# Altium PCB Mega2560_Custom.PcbDoc (part 4 of 6)
Units mil, origin at the board's own origin, x right, y up, seen from the top; angles counter-clockwise.
Board outline 4742.41 x 2889.95 mil, 2 copper layers (Top Layer, Bottom Layer), stack 57 mil thick; 215 components, 134 nets, 793 pads, 779 vias.
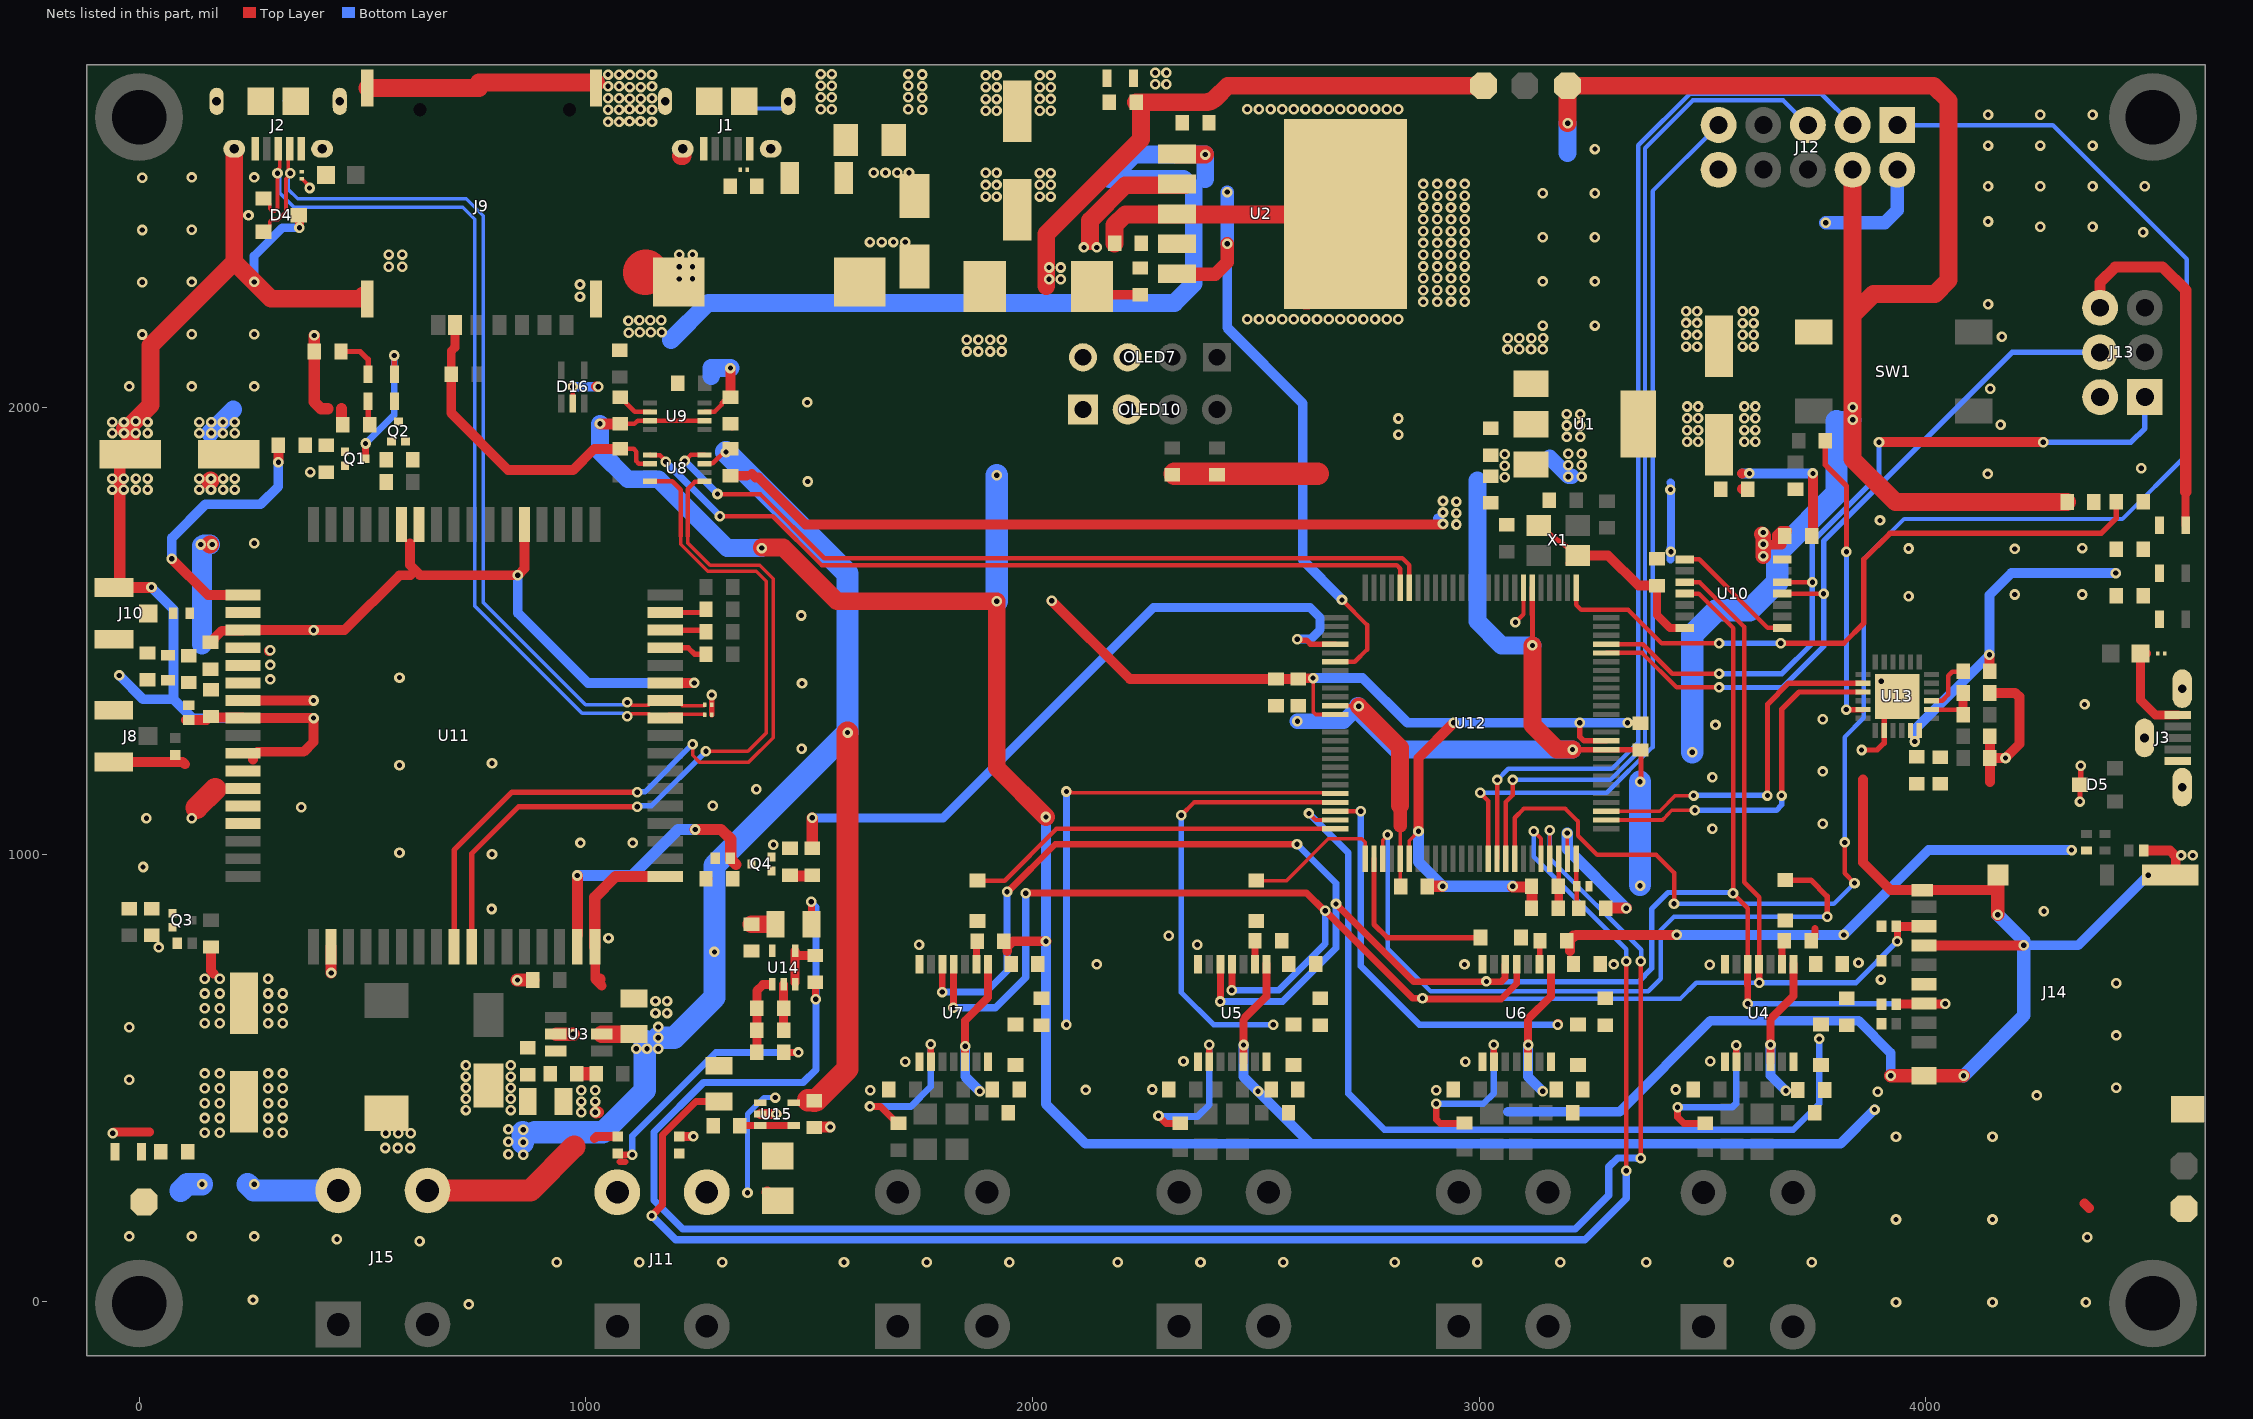
[diagram p2: the nets of this part, all layers, seen from the top]

## Part data (continued)
R35: library part RC0603FR-071ML, "RES SMD 1M OHM 1% 1/10W 0603", Case Code (Imperial)=0603, Case Code (Metric)=1608, LCSC Part Number=C105578, Manufacturer=Yageo, Max Operating Temperature=155°C, Min Operating Temperature=-55°C, Package Quantity=5000, Power Rating=100mW, Resistance=1MR, Supplier Part Number 1=311-1.00MHRDKR-ND, Temperature Coefficient=100ppm/°C, Tolerance=1%, Voltage Rating=50V, Case/Package=0603, ComponentLink1Description=http://www.farnell.com/datasheets/2167052.pdf?src-supplier=Mouser, ComponentLink1URL=http://www.farnell.com/datasheets/2167052.pdf?src-supplier=Mouser, ComponentLink2Description=http://www.farnell.com/datasheets/2167052.pdf?src-supplier=Element14, ComponentLink2URL=http://www.farnell.com/datasheets/2167052.pdf?src-supplier=Element14, ComponentLink3Description=http://documents.rs-components.com/techlib://itc_doclist_GB.htm?stockno=5048956&src-supplier=RSComponents, ComponentLink3URL=http://documents.rs-components.com/techlib://itc_doclist_GB.htm?stockno=5048956&src-supplier=RSComponents, Composition="Thick Film", Depth=0.8mm, Height=0.45mm, Lead Free="Lead Free", Length=1.6mm, Manufacturer Part Number=RC0603FR-071ML, Military Standard=Not, Number of Pins=2, Packaging="Tape and Reel", Pricing 1="1=0.1, 10=0.023, 100=0.0094, 1000=0.00421, 2500=0.00366 (USD)", REACH SVHC="No SVHC", Stock 1=3824601, Supplier 1=Digi-Key, Termination=SMD/SMT, Voltage Rating (DC)=50V, Width=0.8mm
R41 R45 R46: library part RC0603FR-07470RL, "RES 470 OHM 1% 1/10W 0603", Case Code (Imperial)=0603, Case Code (Metric)=1608, LCSC Part Number=C114669, Manufacturer=Yageo, Max Operating Temperature=155°C, Max Power Dissipation=100mW, Min Operating Temperature=-55°C, Package Quantity=1, Resistance Tolerance=1%, Resistor Type="Thick Film", Supplier Part Number 1=311-470HRCT-ND, Temperature Coefficient=100ppm/°C, Voltage Rating=50V, Working Voltage=75V, Case/Package=0603, Category="Chip SMD Resistors", ComponentLink1Description=https://datasheet.ciiva.com/11808/0900766b80f96399-11808177.pdf?src-supplier=RSComponents, ComponentLink1URL=https://datasheet.ciiva.com/11808/0900766b80f96399-11808177.pdf?src-supplier=RSComponents, ComponentLink2Description=https://datasheet.ciiva.com/7746/1738695-7746359.pdf?src-supplier=Element14, ComponentLink2URL=https://datasheet.ciiva.com/7746/1738695-7746359.pdf?src-supplier=Element14, ComponentLink3Description=https://datasheet.ciiva.com/7746/1738695-7746360.pdf?src-supplier=Element14, ComponentLink3URL=https://datasheet.ciiva.com/7746/1738695-7746360.pdf?src-supplier=Element14, ComponentLink4Description=https://datasheet.ciiva.com/7660/1868787-7660793.pdf?src-supplier=Element14, ComponentLink4URL=https://datasheet.ciiva.com/7660/1868787-7660793.pdf?src-supplier=Element14, ComponentLink5Description=https://datasheet.ciiva.com/46440/1868787-46440907.pdf?src-supplier=Element14, ComponentLink5URL=https://datasheet.ciiva.com/46440/1868787-46440907.pdf?src-supplier=Element14, ComponentLink6Description=https://datasheet.ciiva.com/2454/pyu-r-int-thick-7-2454012.pdf?src-supplier=Digi-Key, ComponentLink6URL=https://datasheet.ciiva.com/2454/pyu-r-int-thick-7-2454012.pdf?src-supplier=Digi-Key, ComponentLink7Description=https://datasheet.ciiva.com/2454/pyu-r-int-thick-7-2454013.pdf?src-supplier=Digi-Key, ComponentLink7URL=https://datasheet.ciiva.com/2454/pyu-r-int-thick-7-2454013.pdf?src-supplier=Digi-Key, ComponentLink8Description=https://datasheet.ciiva.com/2454/pyu-r-int-thick-7-2454014.pdf?src-supplier=Digi-Key, ComponentLink8URL=https://datasheet.ciiva.com/2454/pyu-r-int-thick-7-2454014.pdf?src-supplier=Digi-Key, Construction=Rectangular, Depth=0.8mm, Features="Moisture Resistant", Height=0.022inch, Lead Free="Lead Free", Length=1.6mm, Manufacturer Part Number=RC0603FR-07470RL, Military Standard=Not, Number of Terminations=2, Packaging="Tape and Reel", Power Rating=100mW, Pricing 1="1=0.10000, 10=0.02400, 100=0.00970, 1000=0.00436, 2500=0.00378 (USD)", REACH SVHC="No SVHC", Resistance=470R, RoHS=Yes, RoHS Compliant=Yes, Series=RC, Stock 1=154083, Supplier 1=Digi-Key, Technology="THICK FILM", Termination=SMD/SMT, Tolerance=1%, Width=0.031inch
R42: library part RC0603FR-0722K1L, "RES 22.1K OHM 1% 1/10W 0603", Case Code (Imperial)=0603, Case Code (Metric)=1608, LCSC Part Number=C137768, Manufacturer=Yageo, Max Operating Temperature=155°C, Min Operating Temperature=-55°C, Package Quantity=5000, Power Rating=100mW, Resistance=22.1kR, Temperature Coefficient=100ppm/°C, Tolerance=1%, Voltage Rating=50V, Case/Package=0603, Category="Chip SMD Resistors", ComponentLink1Description=https://datasheet.ciiva.com/12555/rc0603-272842-12555287.pdf?src-supplier=Mouser, ComponentLink1URL=https://datasheet.ciiva.com/12555/rc0603-272842-12555287.pdf?src-supplier=Mouser, Height=0.45mm, Item Type=Resistor, Lead Free="Lead Free", Length=1.6mm, Manufacturer Part Number=RC0603FR-0722K1L, Packaging="Tape and Reel", Pricing 1="5000=0.00133, 10000=0.00131, 20000=0.00127 (USD)", RoHS=Yes, RoHS Compliant=Yes, Series=RC, Size Code=0603, Stock 1=595000, Supplier 1=Avnet, Supplier Part Number 1=RC0603FR-0722K1L, Termination=SMD/SMT, Voltage Rating (DC)=50V, Width=0.8mm
R43: library part RC0603FR-0747K5L, "RES 47.5K OHM 1% 1/10W 0603", Case Code (Imperial)=0603, Case Code (Metric)=1608, LCSC Part Number=C137715, Manufacturer=Yageo, Max Operating Temperature=155°C, Max Power Dissipation=100mW, Min Operating Temperature=-55°C, Package Quantity=5000, Resistance=47.5kR, Resistance Tolerance=1%, Resistor Type="Thick Film", Temperature Coefficient=100ppm/°C, Voltage Rating=50V, Case/Package=0603, Category="Chip SMD Resistors", ComponentLink1Description=https://datasheet.ciiva.com/11808/0900766b80f96399-11808343.pdf?src-supplier=RSComponents, ComponentLink1URL=https://datasheet.ciiva.com/11808/0900766b80f96399-11808343.pdf?src-supplier=RSComponents, ComponentLink2Description=https://datasheet.ciiva.com/2454/pyu-r-int-thick-7-2454790.pdf?src-supplier=Digi-Key, ComponentLink2URL=https://datasheet.ciiva.com/2454/pyu-r-int-thick-7-2454790.pdf?src-supplier=Digi-Key, ComponentLink3Description=https://datasheet.ciiva.com/2454/pyu-r-int-thick-7-2454791.pdf?src-supplier=Digi-Key, ComponentLink3URL=https://datasheet.ciiva.com/2454/pyu-r-int-thick-7-2454791.pdf?src-supplier=Digi-Key, ComponentLink4Description=https://datasheet.ciiva.com/2454/pyu-r-int-thick-7-2454789.pdf?src-supplier=Digi-Key, ComponentLink4URL=https://datasheet.ciiva.com/2454/pyu-r-int-thick-7-2454789.pdf?src-supplier=Digi-Key, ComponentLink5Description=https://datasheet.ciiva.com/12555/rc0603-272842-12555285.pdf?src-supplier=Mouser, ComponentLink5URL=https://datasheet.ciiva.com/12555/rc0603-272842-12555285.pdf?src-supplier=Mouser, ComponentLink6Description=https://datasheet.ciiva.com/15189/getdatasheetpartid-135115-15189741.pdf?src-supplier=Verical, ComponentLink6URL=https://datasheet.ciiva.com/15189/getdatasheetpartid-135115-15189741.pdf?src-supplier=Verical, Construction=Rectangular, Depth=0.8mm, Features="Moisture Resistant", Height=0.45mm, Item Type=Resistor, Lead Free="Lead Free", Length=1.6mm, Manufacturer Part Number=RC0603FR-0747K5L, Military Standard=Not, Number of Pins=2, Number of Terminations=2, Packaging="Tape and Reel", Power Rating=100mW, Pricing 1="5000=0.00133, 10000=0.00131, 20000=0.00127 (USD)", Reach SVHC Compliant=Yes, RoHS=Yes, RoHS Compliant=Yes, Series=RC, Size Code=0603, Stock 1=20000, Supplier 1=Avnet, Supplier Part Number 1=RC0603FR-0747K5L, Technology="THICK FILM", Termination=SMD/SMT, Tolerance=1%, Voltage Rating (DC)=50V, Width=0.031inch
R47: library part RC0402FR-0722RL, "RES 22 OHM 1% 1/16W 0402", Case Code (Imperial)=0402, Case Code (Metric)=1005, Manufacturer=Yageo, Max Operating Temperature=155°C, Max Power Dissipation=63mW, Min Operating Temperature=-55°C, Power Rating=62.5mW, Resistance=22R, Resistance Tolerance=1%, Resistor Type="Thick Film", Supplier Part Number 1=311-22.0LRCT-ND, Temperature Coefficient=100ppm/°C, Voltage Rating=50V, Case/Package=0402, Category="Chip SMD Resistors", ComponentLink1Description=https://datasheet.ciiva.com/11819/0900766b80c66297-11819462.pdf?src-supplier=RSComponents, ComponentLink1URL=https://datasheet.ciiva.com/11819/0900766b80c66297-11819462.pdf?src-supplier=RSComponents, ComponentLink2Description=https://datasheet.ciiva.com/7849/1018594-7849912.pdf?src-supplier=Element14, ComponentLink2URL=https://datasheet.ciiva.com/7849/1018594-7849912.pdf?src-supplier=Element14, ComponentLink3Description=https://datasheet.ciiva.com/7849/1018594-7849911.pdf?src-supplier=Element14, ComponentLink3URL=https://datasheet.ciiva.com/7849/1018594-7849911.pdf?src-supplier=Element14, ComponentLink4Description=https://datasheet.ciiva.com/16930/pyu-rc0402-51-rohs-l-6-r-16930687.pdf?src-supplier=Future+Electronics, ComponentLink4URL=https://datasheet.ciiva.com/16930/pyu-rc0402-51-rohs-l-6-r-16930687.pdf?src-supplier=Future+Electronics, ComponentLink5Description=https://datasheet.ciiva.com/26829/getdatasheetpartid-554995-26829991.pdf?src-supplier=Verical, ComponentLink5URL=https://datasheet.ciiva.com/26829/getdatasheetpartid-554995-26829991.pdf?src-supplier=Verical, Construction=Rectangular, Depth=0.5mm, Features="Moisture Resistant", Height=0.32mm, Lead Free="Lead Free", Length=1mm, Manufacturer Part Number=RC0402FR-0722RL, Military Standard=Not, Number of Pins=2, Number of Terminations=2, Packaging="Tape and Reel", Pricing 1="1=0.10000, 10=0.01400, 100=0.00580, 1000=0.00262, 2500=0.00228, 5000=0.00188 (USD)", Reach SVHC Compliant=Yes, RoHS=Yes, RoHS Compliant=Yes, Series=RC, Size Code=0402, Stock 1=7045379, Supplier 1=Digi-Key, Technology="THICK FILM", Termination=SMD/SMT, Tolerance=1%, Voltage Rating (DC)=50V, Width=0.5mm
R48: library part RC0402FR-07100KL, "RES 100K OHM 1% 1/16W 0402", Case Code (Imperial)=0402, Case Code (Metric)=1005, Manufacturer=Yageo, Max Operating Temperature=155°C, Max Power Dissipation=63mW, Min Operating Temperature=-55°C, Package Quantity=1, Resistance=100kR, Resistance Tolerance=1%, Resistor Type="Thick Film", Supplier Part Number 1=603-RC0402FR-07100KL, Temperature Coefficient=100ppm/°C, Voltage Rating=50V, Case/Package=0402, Category="Chip SMD Resistors", ComponentLink1Description=https://datasheet.ciiva.com/11819/0900766b80c66297-11819452.pdf?src-supplier=RSComponents, ComponentLink1URL=https://datasheet.ciiva.com/11819/0900766b80c66297-11819452.pdf?src-supplier=RSComponents, ComponentLink2Description=https://datasheet.ciiva.com/22747/1018594-22747509.pdf?src-supplier=Element14, ComponentLink2URL=https://datasheet.ciiva.com/22747/1018594-22747509.pdf?src-supplier=Element14, ComponentLink3Description=https://datasheet.ciiva.com/2453/pyu-r-int-thick-7-2453362.pdf?src-supplier=Digi-Key, ComponentLink3URL=https://datasheet.ciiva.com/2453/pyu-r-int-thick-7-2453362.pdf?src-supplier=Digi-Key, ComponentLink4Description=https://datasheet.ciiva.com/2453/pyu-r-int-thick-7-2453363.pdf?src-supplier=Digi-Key, ComponentLink4URL=https://datasheet.ciiva.com/2453/pyu-r-int-thick-7-2453363.pdf?src-supplier=Digi-Key, ComponentLink5Description=https://datasheet.ciiva.com/2453/pyu-r-int-thick-7-2453361.pdf?src-supplier=Digi-Key, ComponentLink5URL=https://datasheet.ciiva.com/2453/pyu-r-int-thick-7-2453361.pdf?src-supplier=Digi-Key, ComponentLink6Description=https://datasheet.ciiva.com/12667/pyu-rc0402-51-rohs-l-6-r-12667930.pdf?src-supplier=Mouser, ComponentLink6URL=https://datasheet.ciiva.com/12667/pyu-rc0402-51-rohs-l-6-r-12667930.pdf?src-supplier=Mouser, ComponentLink7Description=https://datasheet.ciiva.com/15189/getdatasheetpartid-323696-15189334.pdf?src-supplier=Verical, ComponentLink7URL=https://datasheet.ciiva.com/15189/getdatasheetpartid-323696-15189334.pdf?src-supplier=Verical, Construction=Rectangular, Depth=0.5mm, Features="Moisture Resistant", Height=0.016inch, Lead Free="Lead Free", Length=0.039inch, Manufacturer Part Number=RC0402FR-07100KL, Military Standard=Not, Number of Terminations=2, Packaging="Tape and Reel", Power Rating=63mW, Pricing 1="1=0.10000, 10=0.01200, 50=0.01200, 100=0.00500, 1000=0.00300, 2500=0.00200, 10000=0.00100 (USD)", REACH SVHC="No SVHC", RoHS=Yes, RoHS Compliant=Yes, Series=RC, Stock 1=7759549, Supplier 1=Mouser, Technology="THICK FILM", Termination=SMD/SMT, Tolerance=1%, Width=0.02inch, Working Voltage=50V
R50: library part ARG06BTC2500, "±0.1% 250Ω 1206 Chip Resistor - Surface Mount ROHS", LCSC Part Number=C3033906, Manufacturer="Viking Tech", Package=1206, ComponentLink1Description=LCSC, ComponentLink1URL=https://www.lcsc.com/product-detail/Chip-Resistor-Surface-Mount_Viking-Tech-ARG06BTC2500_C3033906.html, Item Type=Resistor, Manufacturer Part Number=ARG06BTC2500
R51: library part RT0603BRD073K3L, "RES SMD 3.3K OHM 0.1% 1/10W 0603", Case Code (Imperial)=0603, Case Code (Metric)=1608, LCSC Part Number=C309653, Manufacturer=Yageo, Max Operating Temperature=125°C, Max Power Dissipation=100mW, Min Operating Temperature=-55°C, Package Quantity=5000, Resistance=3.3kR, Resistor Type="Thin Film", Temperature Coefficient=25ppm/°C, Tolerance=0.1%, Voltage Rating=75V, Voltage Rating (DC)=50V, Case/Package=0603, Category="Chip SMD Resistors", ComponentLink1Description=https://datasheet.ciiva.com/11814/0900766b8027bd26-11814026.pdf?src-supplier=Rs, ComponentLink1URL=https://datasheet.ciiva.com/11814/0900766b8027bd26-11814026.pdf?src-supplier=Rs, ComponentLink2Description=https://datasheet.ciiva.com/12694/pyu-rt-1-to-0-05-rohs-l-4-12694839.pdf?src-supplier=Mouser, ComponentLink2URL=https://datasheet.ciiva.com/12694/pyu-rt-1-to-0-05-rohs-l-4-12694839.pdf?src-supplier=Mouser, ComponentLink3Description=https://datasheet.ciiva.com/2585/pyu-rt-1-to-0-05-rohs-l-4-2585926.pdf?src-supplier=Digi-Key, ComponentLink3URL=https://datasheet.ciiva.com/2585/pyu-rt-1-to-0-05-rohs-l-4-2585926.pdf?src-supplier=Digi-Key, Construction=Rectangular, Contact Plating=Tin,Lead, Depth=0.8mm, Features="Moisture Resistant", Height=0.022inch, Item Type=Resistor, Lead Free="Lead Free", Length=0.063inch, Manufacturer Part Number=RT0603BRD073K3L, Military Standard=Not, Number of Terminations=2, Packaging="Tape and Reel", Power Rating=100mW, Pricing 1="1=0.30610, 10=0.21080, 25=0.17430, 100=0.09180, 250=0.09000, 500=0.07600, 1000=0.04220 (USD)", RoHS=Yes, RoHS Compliant=Yes, Series=RT, Stock 1=2417, Supplier 1="Arrow Electronics", Supplier Part Number 1=RT0603BRD073K3L, Termination=SMD/SMT, Width=0.031inch
R52 R55: library part RC0603FR-07680RL, "RES SMD 680 OHM 1% 1/10W 0603", LCSC Part Number=C112310, Manufacturer=Yageo, Package=0603, ComponentLink4Description=LCSC, ComponentLink4URL=https://www.lcsc.com/product-detail/Chip-Resistor-Surface-Mount_YAGEO-RC0603FR-07680RL_C112310.html, Item Type=Resistor, Manufacturer Part Number=RC0603FR-07680RL
R53: library part RC0603JR-070RL, "RES 0 OHM JUMPER 1/10W 0603", Case Code (Imperial)=0603, Case Code (Metric)=1608, LCSC Part Number=C95177, Manufacturer=Yageo, Max Operating Temperature=155°C, Max Power Dissipation=100mW, Min Operating Temperature=-55°C, Package Quantity=5000, Resistance=0mR, Resistance Tolerance=5%, Resistor Type="Thick Film", Supplier Part Number 1=311-0.0GRCT-ND, Temperature Coefficient=200ppm/°C, Tolerance=1%, Voltage Rating=50V, Case/Package=0603, Category="Chip SMD Resistors", Construction=Rectangular, Contact Plating=Tin,Matte, Depth=0.8mm, Features="Moisture Resistant", Height=0.45mm, Item Type=Resistor, Lead Free="Lead Free", Length=1.6mm, Manufacturer Part Number=RC0603JR-070RL, Military Standard=Not, Number of Pins=2, Number of Terminations=2, Packaging="Tape and Reel", Power Rating=100mW, Pricing 1="1=0.10000, 10=0.01700, 25=0.01240, 50=0.00960, 100=0.00700, 250=0.00536, 500=0.00430, 1000=0.00316 (USD)", Radiation Hardening=No, Reach SVHC Compliant="No SVHC", RoHS=Yes, RoHS Compliant=Yes, Series=RC, Size Code=0603, Stock 1=18081776, Supplier 1=Digi-Key, Technology="THICK FILM", Termination=SMD/SMT, Voltage Rating (DC)=50V, Width=0.8mm
R54: library part RT0603BRB072K2L, "RES SMD 2.2K OHM 0.1% 1/10W 0603", Case Code (Imperial)=0603, Case Code (Metric)=1608, LCSC Part Number=C860297, Manufacturer=Yageo, Max Operating Temperature=155°C, Max Power Dissipation=100mW, Min Operating Temperature=-55°C, Supplier Part Number=YAG2182CT-ND, Temperature Coefficient=10ppm/°C, Tolerance=0.1%, Case/Package=0603, Category="Chip SMD Resistors", ComponentLink1Description=http://www.yageo.com/documents/recent/PYu-RT_1-to-0.01_RoHS_L_7.pdf?src-supplier=Digi-Key, ComponentLink1URL=http://www.yageo.com/documents/recent/PYu-RT_1-to-0.01_RoHS_L_7.pdf?src-supplier=Digi-Key, ComponentLink2Description=http://www.yageo.com/documents/recent/PYu-RT_1-to-0.01_RoHS_L_9.pdf?src-supplier=Digi-Key, ComponentLink2URL=http://www.yageo.com/documents/recent/PYu-RT_1-to-0.01_RoHS_L_9.pdf?src-supplier=Digi-Key, Item Type=Resistor, Manufacturer Part Number=RT0603BRB072K2L, Number of Terminations=2, Packaging="Cut Tape", Pricing="1=0.6, 10=0.446, 50=0.3148, 100=0.2597, 500=0.1836, 1000=0.14563 (USD)", RoHS=Yes, RoHS Compliant=Yes, Series=RT, Stock=518, Supplier=Digi-Key
SB1: "Solder Bridge ON"
SW1: library part TL3301NF160QG, "SWITCH TACTILE SPST-NO 0.05A 12V", LCSC Part Number=C273526, Manufacturer=E-Switch, Manufacturer Part Number=TL3301NF160QG/TR, Package="SMD (6.00mm x 6.00mm)", ComponentLink1Description=LCSC, ComponentLink1URL=https://www.lcsc.com/product-detail/Tactile-Switches_E-Switch-TL3301NF160QG_C273526.html
U1: "15V 1.3V @ 800mA Fixed 3.3V SOT-223 Linear Voltage Regulators (LDO) ROHS", LCSC Part Number=C92102, Manufacturer="Diodes Incorporated", Package=SOT-223, ComponentLink1Description=LCSC, ComponentLink1URL=https://lcsc.com/product-detail/Linear-Voltage-Regulators-LDO_Diodes-Incorporated-AZ1117CH-3-3TRG1_C92102.html, Item Type=IC, Manufacturer Part Number=AZ1117CH-3.3TRG1
U2: "IC REG BUCK ADJ 3A TO263-5", Case/Package=TO-263, LCSC Part Number=C1355333, Manufacturer="TI National Semiconductor", Max Input Voltage=40V, Max Operating Temperature=125°C, Max Output current=3A, Max Output Voltage=37V, Min Input Voltage=4.5V, Min Operating Temperature=-40°C, Min Output Voltage=1.2V, Quiescent Current=5mA, Supplier Part Number 1=926-LM2596S-ADJ/NOPB, Switching Frequency=173kHz, Category="Voltage Regulators - Switching", ComponentLink1Description=https://datasheet.ciiva.com/27056/2051160-27056491.pdf?src-supplier=Jameco, ComponentLink1URL=https://datasheet.ciiva.com/27056/2051160-27056491.pdf?src-supplier=Jameco, ComponentLink2Description=https://datasheet.ciiva.com/15112/getdatasheetpartid-55559-15112636.pdf?src-supplier=Verical, ComponentLink2URL=https://datasheet.ciiva.com/15112/getdatasheetpartid-55559-15112636.pdf?src-supplier=Verical, ComponentLink3Description=https://datasheet.ciiva.com/41457/001013814-da-01-en-ic-reg-buc-lm2596s-adj-nopb-to-263-5-tid-41457756.pdf?src-supplier=Conrad, ComponentLink3URL=https://datasheet.ciiva.com/41457/001013814-da-01-en-ic-reg-buc-lm2596s-adj-nopb-to-263-5-tid-41457756.pdf?src-supplier=Conrad, ComponentLink4Description=https://datasheet.ciiva.com/22669/1874590-22669464.pdf?src-supplier=Element14, ComponentLink4URL=https://datasheet.ciiva.com/22669/1874590-22669464.pdf?src-supplier=Element14, ComponentLink5Description=https://datasheet.ciiva.com/14150/jqlm2596x-xx-e-14150653.pdf?src-supplier=Distrelec, ComponentLink5URL=https://datasheet.ciiva.com/14150/jqlm2596x-xx-e-14150653.pdf?src-supplier=Distrelec, ComponentLink6Description=https://datasheet.ciiva.com/6596/lm2596-6596342.pdf?src-supplier=Digi-Key, ComponentLink6URL=https://datasheet.ciiva.com/6596/lm2596-6596342.pdf?src-supplier=Digi-Key, Contact Plating=Tin,Matte, Efficiency=73%, Height=4.57mm, Item Type=IC, Lead Free="Contains Lead", Length=10.16mm, Manufacturer Part Number=LM2596S-ADJ/NOPB, Mount="Surface Mount", Number of Outputs=1, Number of Pins=5, Operating Supply Voltage=40V, Output Current=3A, Output Type=Adjustable, Output Voltage=37V, Packaging=Rail/Tube, Pricing 1="1=7.15000, 10=6.46000, 50=6.16000, 100=5.34000, 1000=5.10000, 10000=5.10000 (USD)", Radiation Hardening=No, Reach SVHC Compliant=Yes, RoHS=Yes, RoHS Compliant=Yes, Series=LM2596, Supplier 1=Mouser, Weight=0.056128oz, Width=8.64mm
U3: "boost converterType 1 Boost 28V 2V~24V 1.2MHz SOT-23-6 DC-DC Converters ROHS", LCSC Part Number=C84817, Manufacturer="XI'AN Aerosemi Tech", Package=SOT-23-6, ComponentLink1Description=LCSC, ComponentLink1URL=https://www.lcsc.com/product-detail/DC-DC-Converters_XI-AN-Aerosemi-Tech-MT3608_C84817.html, Item Type=IC, Manufacturer Part Number=MT3608
U4 U5 U6 U7: "IC CONV THERMOCOUPLE 14TSSOP", Case/Package=TSSOP, LCSC Part Number=C2653162, Manufacturer=Maxim, Max Operating Temperature=125°C, Min Operating Temperature=-55°C, Operating Supply Current=1.2mA, Category="Interface ICs", ComponentLink1Description=https://media.digikey.com/pdf/Data%20Sheets/Maxim%20PDFs/PartNumberBreakdown_ds.pdf?src-supplier=Digi-Key, ComponentLink1URL=https://media.digikey.com/pdf/Data%20Sheets/Maxim%20PDFs/PartNumberBreakdown_ds.pdf?src-supplier=Digi-Key, ComponentLink2Description=http://datasheets.maximintegrated.com/en/ds/MAX31856.pdf?src-supplier=Avnet, ComponentLink2URL=http://datasheets.maximintegrated.com/en/ds/MAX31856.pdf?src-supplier=Avnet, Interface=SPI, Item Type=IC, Manufacturer Part Number=MAX31856MUD+T, Mount="Surface Mount", Number of Pins=14, Output Type=Digital, Packaging="Tape and Reel", Pricing 1="1=10.21890, 10=9.52090, 25=9.06320, 100=7.80510, 250=7.38990, 500=6.66890, 1000=6.39750, 3000=6.32960 (USD)", RoHS=Yes, RoHS Compliant=Yes, Stock 1=2890, Supplier 1="Arrow Electronics", Supplier Part Number 1=MAX31856MUD+T
U8: "IC TRNSLTR BIDIRECTIONAL US8", Case/Package=VSSOP, High Level Output Current=-20uA, LCSC Part Number=C2677366, Low Level Output Current=20uA, Manufacturer="Texas Instruments", Max Operating Temperature=85°C, Max Supply Voltage=5.5V, Min Operating Temperature=-40°C, Min Supply Voltage=1.65V, Output Current=50mA, Package Quantity=1, Category="Integrated Circuits (ICs)", ComponentLink1Description=https://datasheet.ciiva.com/4226/sces641b-4226901.pdf?src-supplier=Arrow+Electronics, ComponentLink1URL=https://datasheet.ciiva.com/4226/sces641b-4226901.pdf?src-supplier=Arrow+Electronics, ComponentLink2Description=https://datasheet.ciiva.com/15096/getdatasheetpartid-226009-15096242.pdf?src-supplier=Verical, ComponentLink2URL=https://datasheet.ciiva.com/15096/getdatasheetpartid-226009-15096242.pdf?src-supplier=Verical, ComponentLink3Description=https://datasheet.ciiva.com/14287/txb0102-14287498.pdf?src-supplier=Avnet, ComponentLink3URL=https://datasheet.ciiva.com/14287/txb0102-14287498.pdf?src-supplier=Avnet, ComponentLink4Description=https://datasheet.ciiva.com/14287/txb0102-14287370.pdf?src-supplier=Avnet, ComponentLink4URL=https://datasheet.ciiva.com/14287/txb0102-14287370.pdf?src-supplier=Avnet, ComponentLink5Description=https://datasheet.ciiva.com/6619/txb0102-6619255.pdf?src-supplier=Digi-Key, ComponentLink5URL=https://datasheet.ciiva.com/6619/txb0102-6619255.pdf?src-supplier=Digi-Key, ComponentLink6Description=https://datasheet.ciiva.com/6619/txb0102-6619256.pdf?src-supplier=Digi-Key, ComponentLink6URL=https://datasheet.ciiva.com/6619/txb0102-6619256.pdf?src-supplier=Digi-Key, ComponentLink7Description=https://datasheet.ciiva.com/6619/txb0102-6619257.pdf?src-supplier=Digi-Key, ComponentLink7URL=https://datasheet.ciiva.com/6619/txb0102-6619257.pdf?src-supplier=Digi-Key, Contact Plating=Gold, Data Rate=100Mbps, Height=0.85mm, Item Type=IC, Lead Free="Lead Free", Length=2.3mm, Logic Function=Translator, Manufacturer Part Number=TXB0102DCUT, Mount="Surface Mount", Number of Bits=2, Number of Channels=2, Number of Inputs=2, Number of Pins=8, Output Type=3-STATE, Packaging="Tape and Reel", Pricing 1="1=0.79330, 10=0.66470, 25=0.65820, 250=0.37450, 500=0.36200, 1000=0.29770, 2500=0.28440 (USD)", Propagation Delay=31ns, Radiation Hardening=No, REACH SVHC="No SVHC", RoHS=Yes, RoHS Compliant=Yes, Series=-, Stock 1=10, Supplier 1="Arrow Electronics", Supplier Part Number 1=TXB0102DCUT, Turn-On Delay Time=7.4ns, Weight=0.000339oz, Width=2mm
U9: "IC TRANSLTR BIDIRECTIONAL 8VSSOP", Case/Package=VSSOP, LCSC Part Number=C53434, Manufacturer="Texas Instruments", Max Operating Temperature=85°C, Max Supply Voltage=3.6V, Min Operating Temperature=-40°C, Min Supply Voltage=1.65V, Nominal Supply Voltage=1.8V, Package Body Material=Plastic, Package Shape=Rectangular, Package Style="SMALL OUTLINE, VERY THIN PROFILE, SHRINK PITCHMeter", Peak Reflow Temperature (Cel)=260°C, Power Supplies=1.8/3.3,2.5/5V, Supplier Part Number 1=595-TXS0102DCUR, Supply Voltage1-Max=5.5V, Supply Voltage1-Min=2.3V, Supply Voltage1-Nom=2.5V, Temperature Grade=INDUSTRIAL, Category="Voltage Level Shifters", Channels=1, ComponentLink1Description=https://www.ti.com:443/lit/ds/symlink/txs0102.pdf?src-supplier=IHS+Markit, ComponentLink1URL=https://www.ti.com:443/lit/ds/symlink/txs0102.pdf?src-supplier=IHS+Markit, ComponentLink2Description=https://datasheet.ciiva.com/22653/1846850-22653373.pdf?src-supplier=Farnell, ComponentLink2URL=https://datasheet.ciiva.com/22653/1846850-22653373.pdf?src-supplier=Farnell, ComponentLink3Description=https://datasheet.ciiva.com/15096/getdatasheetpartid-118249-15096172.pdf?src-supplier=Verical, ComponentLink3URL=https://datasheet.ciiva.com/15096/getdatasheetpartid-118249-15096172.pdf?src-supplier=Verical, ComponentLink4Description=https://datasheet.ciiva.com/1508/1857232-1508821.pdf?src-supplier=Element14, ComponentLink4URL=https://datasheet.ciiva.com/1508/1857232-1508821.pdf?src-supplier=Element14, ComponentLink5Description=https://datasheet.ciiva.com/28499/1863639-28499676.pdf?src-supplier=Element14, ComponentLink5URL=https://datasheet.ciiva.com/28499/1863639-28499676.pdf?src-supplier=Element14, ComponentLink6Description=https://datasheet.ciiva.com/46395/1863639-46395871.pdf?src-supplier=Element14, ComponentLink6URL=https://datasheet.ciiva.com/46395/1863639-46395871.pdf?src-supplier=Element14, ComponentLink7Description=https://datasheet.ciiva.com/1899/txs0102-1899369.pdf?src-supplier=Digi-Key, ComponentLink7URL=https://datasheet.ciiva.com/1899/txs0102-1899369.pdf?src-supplier=Digi-Key, ComponentLink8Description=https://datasheet.ciiva.com/1899/txs0102-1899368.pdf?src-supplier=Digi-Key, ComponentLink8URL=https://datasheet.ciiva.com/1899/txs0102-1899368.pdf?src-supplier=Digi-Key, ComponentLink9Description=https://datasheet.ciiva.com/1899/txs0102-1899370.pdf?src-supplier=Digi-Key, ComponentLink9URL=https://datasheet.ciiva.com/1899/txs0102-1899370.pdf?src-supplier=Digi-Key, ComponentLink10Description=https://datasheet.ciiva.com/14287/txs0102-14287516.pdf?src-supplier=Avnet, ComponentLink10URL=https://datasheet.ciiva.com/14287/txs0102-14287516.pdf?src-supplier=Avnet, Height - Seated (Max)=0.9mm, Interface IC Type="INTERFACE CIRCUIT", Item Type=IC, JESD-30 Code=R-PDSO-G8, JESD-609 Code=e4, Length=2.3mm, Manufacturer Part Number=TXS0102DCUR, Moisture Sensitivity Level=1, Pins=8, Pricing 1="1=0.93000, 10=0.83300, 50=0.79000, 100=0.64900, 1000=0.42300, 10000=0.40900 (USD)", Qualification Status="Not Qualified", Reach SVHC Compliant=Yes, RoHS=Yes, RoHS Compliant=Yes, Stock 1=246792, Supplier 1=Mouser, Surface Mount=Yes, Terminal Finish=Nickel, Terminal Form="Gull Wing", Terminal Pitch=0.5mm, Terminal Position=DUAL, Width=2mm
U10: "IC TRANSLATOR BIDIR 14TSSOP", Case/Package=TSSOP, High Level Output Current=-20uA, LCSC Part Number=C60708, Low Level Output Current=20uA, Manufacturer="Texas Instruments", Max Operating Temperature=85°C, Max Supply Voltage=5.5V, Min Operating Temperature=-40°C, Min Supply Voltage=1.2V, Nominal Supply Current=5uA, Package Quantity=2000, Quiescent Current=3.5uA, Category="Voltage Level Shifters", Channel Type=Bidirectional, ComponentLink1Description=https://datasheet.ciiva.com/1508/1633692-1508723.pdf?src-supplier=Element14, ComponentLink1URL=https://datasheet.ciiva.com/1508/1633692-1508723.pdf?src-supplier=Element14, ComponentLink2Description=https://datasheet.ciiva.com/22653/1845221-22653354.pdf?src-supplier=Farnell, ComponentLink2URL=https://datasheet.ciiva.com/22653/1845221-22653354.pdf?src-supplier=Farnell, ComponentLink3Description=https://datasheet.ciiva.com/15096/getdatasheetpartid-48026-15096134.pdf?src-supplier=Verical, ComponentLink3URL=https://datasheet.ciiva.com/15096/getdatasheetpartid-48026-15096134.pdf?src-supplier=Verical, ComponentLink4Description=https://datasheet.ciiva.com/1508/1849862-1508724.pdf?src-supplier=Element14, ComponentLink4URL=https://datasheet.ciiva.com/1508/1849862-1508724.pdf?src-supplier=Element14, ComponentLink5Description=https://datasheet.ciiva.com/46395/1864432-46395886.pdf?src-supplier=Element14, ComponentLink5URL=https://datasheet.ciiva.com/46395/1864432-46395886.pdf?src-supplier=Element14, ComponentLink6Description=https://datasheet.ciiva.com/1899/txb0104-1899515.pdf?src-supplier=Digi-Key, ComponentLink6URL=https://datasheet.ciiva.com/1899/txb0104-1899515.pdf?src-supplier=Digi-Key, ComponentLink7Description=https://datasheet.ciiva.com/1899/txb0104-1899514.pdf?src-supplier=Digi-Key, ComponentLink7URL=https://datasheet.ciiva.com/1899/txb0104-1899514.pdf?src-supplier=Digi-Key, ComponentLink8Description=https://datasheet.ciiva.com/1899/txb0104-1899516.pdf?src-supplier=Digi-Key, ComponentLink8URL=https://datasheet.ciiva.com/1899/txb0104-1899516.pdf?src-supplier=Digi-Key, ComponentLink9Description=https://datasheet.ciiva.com/14287/txb0104-14287375.pdf?src-supplier=Avnet, ComponentLink9URL=https://datasheet.ciiva.com/14287/txb0104-14287375.pdf?src-supplier=Avnet, Data Rate=100Mbps, Height=1.15mm, Item Type=IC, Lead Free="Lead Free", Length=5mm, Logic Function=Translator, Manufacturer Part Number=TXB0104PWR, Mount="Surface Mount", Number of Bits=4, Number of Channels=4, Number of Circuits=1, Number of Inputs=4, Number of Pins=14, Output Current=20uA, Output Type=3-STATE, Packaging="Tape and Reel", Pricing 1="1=1.50780, 10=1.39060, 25=1.29340, 100=1.11370, 250=1.03790, 500=0.97230, 1000=0.92410 (USD)", Propagation Delay=31ns, Radiation Hardening=No, Reach SVHC Compliant=Yes, RoHS=Yes, RoHS Compliant=Yes, Series=-, Stock 1=1658, Supplier 1="Arrow Electronics", Supplier Part Number 1=TXB0104PWR, Turn-On Delay Time=7.4ns, Weight=0.002018oz, Width=4.4mm
U11: "eMTC CAT-M1 Module 700MHz/1700MHz/1900MHz 3.8V LCC", LCSC Part Number=C126271, Manufacturer=Simcom, Category=Uncategorized, ComponentLink1Description=LCSC, ComponentLink1URL=https://www.lcsc.com/product-detail/2G-3G-4G-5G-Modules_SIMCom-Wireless-Solutions-SIM7000A_C126271.html, Item Type=Module, Manufacturer Part Number=SIM7000A, Pricing 1="50=18.60000, 100=17.40000, 200=16.20000, 300=15.60000, 400=15.00000, 500=15.00000, 5000=14.64000 (USD)", RoHS=No, Supplier 1=Avnet, Supplier Part Number 1=SIM7000A
U12: "IC MCU 8BIT 256KB FLASH 100TQFP", Case/Package=A, Frequency=16MHz, LCSC Part Number=C22460, Manufacturer=Microchip, Max Operating Temperature=85°C, Max Supply Voltage=5.5V, Min Operating Temperature=-40°C, Min Supply Voltage=4.5V, Operating Supply Voltage=5V, Package Body Material=Plastic, Package Code=TFQFP, Package Quantity=90, Package Shape=Square, Peak Reflow Temperature (Cel)=260°C, Supplier Part Number 1=68T2776, Temperature Grade=INDUSTRIAL, Time @ Peak Reflow Temperature-Max (s)=40s, Access Time=16us, Category=Uncategorized, ComponentLink1Description=https://datasheet.ciiva.com/22651/1698622-22651116.pdf?src-supplier=Farnell, ComponentLink1URL=https://datasheet.ciiva.com/22651/1698622-22651116.pdf?src-supplier=Farnell, ComponentLink2Description=https://datasheet.ciiva.com/15122/getdatasheetpartid-134542-15122545.pdf?src-supplier=Verical, ComponentLink2URL=https://datasheet.ciiva.com/15122/getdatasheetpartid-134542-15122545.pdf?src-supplier=Verical, ComponentLink3Description=https://datasheet.ciiva.com/29119/154804-da-01-en-atmega2560-16au-tqfp-100-29119580.pdf?src-supplier=Conrad, ComponentLink3URL=https://datasheet.ciiva.com/29119/154804-da-01-en-atmega2560-16au-tqfp-100-29119580.pdf?src-supplier=Conrad, ComponentLink4Description=https://datasheet.ciiva.com/6640/atmel-2549-8-bit-avr-microcontroller-atmega640-1280-1281-2560-2561-summary-6640293.pdf?src-supplier=Digi-Key, ComponentLink4URL=https://datasheet.ciiva.com/6640/atmel-2549-8-bit-avr-microcontroller-atmega640-1280-1281-2560-2561-summary-6640293.pdf?src-supplier=Digi-Key, ComponentLink5Description=https://datasheet.ciiva.com/1162/33246-1162139.pdf?src-supplier=Farnell, ComponentLink5URL=https://datasheet.ciiva.com/1162/33246-1162139.pdf?src-supplier=Farnell, ComponentLink6Description=https://datasheet.ciiva.com/1157/1817551-1157521.pdf?src-supplier=Element14, ComponentLink6URL=https://datasheet.ciiva.com/1157/1817551-1157521.pdf?src-supplier=Element14, ComponentLink7Description=https://datasheet.ciiva.com/16936/70123980-16936268.pdf?src-supplier=Allied+Electronics, ComponentLink7URL=https://datasheet.ciiva.com/16936/70123980-16936268.pdf?src-supplier=Allied+Electronics, Core Architecture=AVR, Data Bus Width=8b, Density=256KB, Height=1.05mm, Interface=I2C,SPI,UART,USART,EBI/EMI,2-Wire, Item Type=IC, JESD-30 Code=S-PQFP-G100, Lead Free="Lead Free", Length=14.1mm, Manufacturer Part Number=ATMEGA2560-16AU, Max Frequency=16MHz, Memory Size=256KB, Memory Type=FLASH, Moisture Sensitivity Level=3, Mount="Surface Mount", Number of ADC Channels=16, Number of I2C Channels=1, Number of I/O Lines=86, Number of I/Os=86, Number of Pins=100, Number of Programmable I/O=86, Number of PWM Channels=12, Number of SPI Channels=1, Number of Terminals/Pins=100, Number of Timers/Counters=6, Oscillator Type=Internal, Packaging=Tray, Peripherals="PWM,Brown-out Detect/Reset,POR,WDT", Pricing 1="1=12.70000 (USD)", Radiation Hardening=No, RAM Size=8KB, Reach SVHC Compliant=Yes, RoHS=Yes, RoHS Compliant=Yes, Series="AVR® ATmega", Stock 1=4, Supplier 1=Avnet, Surface Mount=Yes, Technology=CMOS, Terminal Finish=Tin, Terminal Form="Gull Wing", Terminal Position=QUAD, Termination=SMD/SMT, Watchdog Timer=Yes, Width=14.1mm
U13: "IC USB TO UART BRIDGE QFN24", LCSC Part Number=C969151, Manufacturer="Silicon Labs", Category="Interface ICs", ComponentLink1Description=https://www.silabs.com/documents/public/data-sheets/cp2102n-datasheet.pdf?src-supplier=Digi-Key, ComponentLink1URL=https://www.silabs.com/documents/public/data-sheets/cp2102n-datasheet.pdf?src-supplier=Digi-Key, Item Type=IC, Manufacturer Part Number=CP2102N-A02-GQFN24R, Pricing 1="1=2.66900, 10=2.64300, 25=2.61700, 100=2.59000, 250=2.56400 (USD)", RoHS=Yes, Stock 1=321, Supplier 1="Arrow Electronics", Supplier Part Number 1=CP2102N-A02-GQFN24R
U14 U15: "IC OPAMP GP 1 CIRCUIT SC70-5", LCSC Part Number=C4366617, Manufacturer="Texas Instruments", Supplier Part Number 1=595-TLV9301IDCKR, Category="Amplifiers - Op Amps, Buffer, Instrumentation", Item Type=IC, Manufacturer Part Number=TLV9301IDCKR, Pricing 1="1=0.67, 10=0.562, 50=0.562, 100=0.445, 1000=0.284, 10000=0.283 (USD)", RoHS=No, Stock 1=29098, Supplier 1=Mouser
X1: "16MHz SMD Crystal Resonator 9pF ±10ppm ±30ppm -40℃~+85℃ SMD3225-4P Crystals ROHS", LCSC Part Number=C13738, Manufacturer="Yangxing Tech", Package=SMD3225-4P, ComponentLink1Description=LCSC, ComponentLink1URL=https://www.lcsc.com/product-detail/Crystals_Yangxing-Tech-X322516MLB4SI_C13738.html, Item Type=Crystal, Manufacturer Part Number=X322516MLB4SI

## Free pads (board coordinates)
  round 196.85 hole 122.05: MH(0,-5) MH(0,2650.77) MH(4508.05,2650.77) MH(4508.05,-5)

## Via types
v1: diameter 23.62, hole 11.81, Top Layer to Bottom Layer, 779 vias

## Nets (pads, with @x,y where several pads share a name; then routed paths per layer and width w, separated by ;. In a path a pad name is that pad's centre, name@x,y a point inside that pad or via, vN(x,y) a via of type N, cw(c..) or ccw(c..) an arc to the next point about the centre after c; other vN are vias at no path point)
3.3V: C6.1 C7.2 C9.2 C10.2 C12.2 C13.2 C19.2 C20.2 C21.2 C22.2 C30.1 C32.1 J14.4 OLED7.3 OLED10.2 P6.1 R8.2 R9.2 R14.2 R15.2 R36.2 R37.2 R48.2 U1.2 U1.4 U4.5 U4.8 U5.5 U5.8 U6.5 U6.8 U7.5 U7.8 U9.3 U9.6 U10.1 U10.8 | length 8462.7
  Top Layer w8: C30.1@3396.82,1664.95 C30.1@3401.05,1660.72
  Top Layer w10: C32.1@1076.82,1963.95 1108.82,1963.95 1115.98,1971.11 U9.3@1143.8,1971.11 U9.6@1265.85,1971.11 ; U10.1@3459.57,1660.72 3492.19,1660.72 3645.74,1507.18 U10.8@3678.07,1507.18
  Top Layer w16: R8.2@3751.46,815.41 3751.46,834.64
  Top Layer w18: U7.5@1849.23,535.91 1849.37,536.05 v1(1849.37,570.59) 1849.37,628.49 1900.55,679.67 U7.8@1900.55,751.45 ; U5.5@2472.41,535.91 v1(2472.41,573.55) 2472.41,631.45 2523.59,682.63 U5.8@2523.59,754.41 ; U6.5@3109.45,535.91 v1(3109.45,573.55) 3109.45,631.45 3160.63,682.63 U6.8@3160.63,754.41 ; R14.2@3196,807 R14.2@3210,821 ; v1(3652,574) v1@3652.09,573.91 ; U4.5@3652.18,535.91 3652.09,536 v1@3652.09,573.91 ; U4.8@3703.27,754.77 3703.27,682.99 3652.09,631.81 v1@3652.09,573.91
  Top Layer w22: 1943.28,783.75 1943.28,793.5 1955.78,806 v1(2030,806) v1@2031,806 ; 3203.5,783.75 3203.5,807.5 3216,820 v1(3442,820) ; 4355.13,218.95 4365.13,208.95 ; P6.1@4575.82,208.95 P6.1@4577.82,206.95
  Top Layer w25: v1(1031.82,1963.95) C32.1@1076.82,1963.95
  Top Layer w40: v1@1394,1686.95 1442.05,1686.95 1562.05,1566.95 v1(1919.82,1566.95) 1919.82,1194.18 v1(2030,1084)
  Top Layer w50: R36.2@2318,1852 2638.71,1852
  Bottom Layer w18: 3427.82,1660.72 v1@3427.82,1679.64 ; 3427.82,1832.95 3429,1831.77 3429,1687 3427.82,1685.82 v1@3427.82,1679.64 ; v1@3429,1679.64 v1@3427.82,1679.64
  Bottom Layer w22: v1(1849.37,570.59) 1849.37,502.41 v1(1881.78,470) ; v1(2030,1084) v1(2030,806) 2030,441 2118.5,352.5 2622.46,352.5 ; v1(2472.41,573.55) 2472.41,502.55 v1(2504.96,470) 2622.46,352.5 ; v1(3109.45,573.55) 3109.45,502.55 v1(3142,470) ; v1(3442,820) v1(3816,820) 4005.95,1009.95 v1(4325.82,1009.95) ; v1(3652,574) 3652,505.54 v1(3686.54,471) ; v1(3885,429) 3808.5,352.5 2622.46,352.5
  Bottom Layer w40: v1(1031.82,1963.95) 1031.82,1902.18 1094.05,1839.95 1162.82,1839.95 1316.77,1686 v1(1394,1686)
  Bottom Layer w50: v1(1919.82,1566.95) v1(1919.82,1849)
  other v1: 3429,1677.64 3428,1817 3465.18,1923.82 3489.78,1923.82 3196,1934.67 3226,1934.67 2819,1940 3465.18,1949.82 3489.78,1949.82 3196,1960.33 3226,1960.33 2819,1976 3465.18,1976.82 3489.78,1976.82 3196,1986 3226,1986 3465.18,2002.82 3489.78,2002.82
5V: C1.2 C2.2 C3.2 C4.1 C31.1 C33.1 C45.1 C46.1 C47.1 C54.1 C56.1 C61.2 Cx2.1 FB1.2 FB10.1 J12.4 L1.1 P1.1 R38.2 R39.2 R40.2 R49.2 SB1.2 U1.3 U2.1 U3.5 U8.7 U9.7 U10.14 U12.10 U12.31 U12.61 U12.80 U14.5 U15.5 | length 11699.8
  Top Layer w8: U12.61@2677.67,1333.17 2678.26,1332.58 2729.42,1332.58 v1(2730,1332) ; U12.80@2823.34,991.31 2823.34,1063.66 ; U12.80@2823.67,990.98 U12.80@2823.34,990.65 2823.34,929.16 C46.1@2824,928.5
  Top Layer w10: U8.7@1265.85,1874.79 1266.75,1875.7 1284.36,1875.7 1313.82,1905.16 1313.82,1907.95 C54.1@1323.82,1907.95 1316.82,1900.95 v1(1313.82,1900.95) ; U9.7@1265.85,1990.79 1266.3,1991.24 1288.26,1991.24 1304,2006.98 1304,2011 1307.13,2014.13 1311.14,2014.13 C33.1@1320.96,2023.95 ; U12.80@2823.34,991.31 U12.80@2823.67,990.98
  Top Layer w12: U12.31@3118.62,1596.95 3119.1,1472 v1@3119.1,1471.9 ; v1(3208.82,1234.95) 3208.93,1234.84 U12.10@3283.97,1234.84 ; U12.10@3283.97,1234.74 3355.74,1234.74 3356,1235 3362,1229 v1@3362,1161 ; v1(3360,1163) v1@3362,1161 ; v1@3363,1159 3362,1160 v1@3362,1161
  Top Layer w22: C33.1@1323.82,2023.95 v1(1323.82,2088.95) ; 3655.2,1693.45 3677.32,1693.45 ; 3666.82,1695.45 3666.82,1714.95 3675.82,1723.95 C31.1@3688.82,1723.95
  Top Layer w29.53: 2821,1110 2823.34,1107.66 2823.34,1063.66
  Top Layer w35: v1@3632.5,1717 3636,1713.5 v1(3636,1694.5) v1(3636,1668)
  Top Layer w39.37: U3.5@1035.57,598 C3.2@1108,598 ; v1(2730,1332) 2823,1239
  Top Layer w40: C4.1@1965.82,2443.71 C4.1@1967.82,2445.71 ; U2.1@2323,2567 2323.19,2566.81 v1(2386.68,2566.81) ; 2823,1110 2823,1239 ; v1(3119,1468) 3119,1289.77 3173.82,1234.95 v1(3208.82,1234.95) ; v1(3197.82,2636.95) P1.1@3197.82,2720.95 4017.05,2720.95 4050.82,2687.18 4050.82,2285.82 4019.95,2254.95 3882.82,2254.95 3835.82,2207.95 ; J12.4@3835.82,2532.95 3835.82,2207.95 ; SB1.2@4315.82,1788.95 3931.82,1788.95 3835.82,1884.95 v1(3835.82,1972.95) v1(3835.82,2000.95) 3835.82,2207.95
  Top Layer w50: Cx2.1@1497.5,450 Cx2.1@1516,450 ; Cx2.1@1511,449 Cx2.1@1511.81,449 ; Cx2.1@1519,453 1586,520 v1(1586,1273)
  Bottom Layer w35: v1(2593,1298) 2696,1298 v1(2730,1332) ; 3158,1889 3200.17,1846.83 v1@3207.17,1846.83
  Bottom Layer w40: 1190.82,2151.47 1274.3,2234.95 2317.95,2234.95 2361,2278 2361,2488.95 2338,2511.95 2172.18,2511.95 2227.04,2566.81 v1(2386.68,2566.81) 2386.68,2511.95 ; 1280.82,2070.95 1280.82,2088.95 v1(1323.82,2088.95) ; v1@2729,1333 v1(2730,1332) ; v1@2730,1321 2816.05,1234.95 v1(3208.82,1234.95) ; 2996,1837 2996,1522 3050,1468 v1(3119,1468) ; 3197.82,2570 v1(3197.82,2636.95) ; 3799.82,1969.95 3802.82,1972.95 v1(3835.82,1972.95)
  Bottom Layer w50: v1@858.82,354.95 v1@858.82,378.95 ; 885.82,377.95 1037.95,377.95 1132.32,472.32 1132.32,583 ; v1(1162,590) 1198.18,590 1288,679.83 v1(1288,782) 1288,975 v1(1586,1273) 1586,1628.77 v1(1313.82,1900.95) ; v1@3360,932 v1(3360,1163) ; v1(3477,1229) 3477,1492 3532,1547 3605,1547 3667,1609 3667,1661 ; 3676.5,1684.5 3799.82,1807.82 3799.82,1969.95
  other v1: 859.82,327.95 826.82,328.95 551,343 579,343 607,343 859.82,355.95 826.82,356.95 552,376 580,376 608,376 859.82,383.95 826.82,384.95 1113,565 1137,565 1162,565 1162,614 3360,930 3636,1721 3057,1844.67 3199,1845.67 3229,1845.67 3057,1870.33 3199,1871.33 3229,1871.33 3057,1896 3199,1897 3229,1897 1096.38,2168.05 1121,2169 1145.6,2169 1170.2,2169 1095.38,2195.05 1120,2196 1144.6,2196 1169.2,2196 1895,2472.82 1919.6,2472.82 2016.4,2472.82 2041,2472.82 1895,2498.82 1919.6,2498.82 2016.4,2499.15 2041,2499.15 1895,2525.82 1919.6,2525.82 2016.4,2525.48 2041,2525.48
5VACC: C60.1 FB10.2 U12.100 | length 118.8
  Top Layer w10: C60.1@3217,875 C60.1@3218.04,876.04 ; FB10.2@3217.04,925.04 U12.100@3217.04,990.65 ; FB10.2@3218.22,929 3218.22,879.78 C60.1@3220,878
12V: C5.2 C53.1 D6.1 J15.2 P5.1 R4.2 R6.2 | length 264.2
  Bottom Layer w40: J15.2@444.82,246.95 J15.2@445.82,247.95
  Bottom Layer w50: 92.82,246.95 107.87,262 v1(141,262) v1(141,262) ; 242.72,262 256.77,247.95 443.82,247.95 J15.2@444.82,246.95
  other v1: 257.77,262.05 147.35,376.95 180.35,376.95 288.82,376.95 321.82,376.95 147.35,410.2 180.35,410.2 288.82,410.2 321.82,410.2 731.65,428 832,428 147.35,443.45 180.35,443.45 288.82,443.45 321.82,443.45 731.65,453 832,453 147.35,476.7 180.35,476.7 288.82,476.7 321.82,476.7 731.65,478 832,478 731.65,503 832,503 147.35,509.95 180.35,509.95 288.82,509.95 321.82,509.95 731.65,528 832,528
ADC0: Cx4.2 R55.2 U12.97 | length 4244.9
  Top Layer w8: U12.97@3157.99,990.65 v1(3157.99,1054.01)
  Top Layer w10: v1(3361.41,320) v1(3361.41,761)
  Top Layer w16: Cx4.2@1505,844 v1(1505,894) ; v1@1514.5,682.5 R55.2@1514.5,713.5
  Bottom Layer w10: v1(3157.99,1054.01) 3157.99,991.01 3362.41,786.59 v1@3362.41,761
  Bottom Layer w16: v1(1505,894) 1505,891.94 1515,881.94 v1(1515,676) 1515,518 1487,490 1264,490 1153,379 1153,226 1217,162 3214.87,162 3290,237.13 3290,301 3309.95,320.95 3351.05,320.95 v1@3352,320
ADC0/IN: D23.1 J11.2 R51.2 | length 576.4
  Top Layer w15: J11.2@1069,243.95 1069,240 J11.2@1071,238 ; D23.1@1072,330.91 1074.91,328 v1(1104,328) ; 1076,312 1088,312 ; R51.2@1443,557 v1(1476,557)
  Bottom Layer w15: v1(1104,328) 1104,370 1291,557 v1(1476,557)
ADC1: Cx3.2 R52.2 U12.96 | length 3580
  Top Layer w8: v1(3122,1052) 3138.3,1035.7 U12.96@3138.3,990.65
  Top Layer w10: v1(3329,291.95) v1(3329,761)
  Top Layer w16: v1(1147.46,191.46) 1172,216 1172,372.29 1246.71,447 Cx3.2@1298,447 Cx3.2@1288,437
  Bottom Layer w10: v1(3122,1052) 3122,995 3329,788 v1(3329,761)
  Bottom Layer w16: v1(1147.46,191.46) 1201.34,137.57 3236.44,137.57 3329,230.13 v1(3329,291.95)
ADC1/IN: D24.1 J11.4 R50.2 U15.1 | length 285.1
  Top Layer w25: R50.2@1406.05,243.95 1425,225 R50.2@1430,225
  Bottom Layer w12: v1(1362,243) 1362,419 1399,456 v1(1424,456)
AREF: C48.1 C62.1 U12.98 | length 133.3
  Top Layer w10: C48.1@3177,918 3177.67,918.67 U12.98@3177.67,990.65 ; C62.1@3178,880 3178,870 C62.1@3179,869
  Top Layer w20: C62.1@3178,880 C48.1@3178,929
BUFFER1: R52.1 U15.3 U15.4 | length 111.6
  Top Layer w15: R52.1@1354,393 1354.41,393.41 U15.3@1390.6,393.41 U15.4@1465.4,393.41
CP_VDD: C51.1 C52.1 R44.1 R45.2 R46.2 U13.5 U13.6 | length 738
  Top Layer w22: v1(4142,1447) 4142.31,1446.69 4142.31,1410.69 R44.1@4143,1410
  Bottom Layer w22: v1(3974.82,1252.95) 3974.82,1279.82 v1(4142,1447) 4142,1581 4191,1630 v1(4425,1630)
CS1: D8.1 U12.78 | length 1622.5
  Top Layer w8: U12.78@2783.97,990.65 2783.97,1032.05 2794.82,1042.9 v1(2794.82,1043.95)
  Top Layer w12: D8.1@3685,942.55 3742.45,942.55 3778.82,906.18 v1(3778.82,860.95)
  Bottom Layer w10: v1(2794.82,1043.95) 2794.82,790.18 2891,694 3378,694 3406,722 3406,831 3435.95,860.95 v1(3778.82,860.95)
CS2: D12.1 U12.77 | length 397.4
  Top Layer w12: U12.77@2764.29,990.65 2764.29,843.71 2794,814 D12.1@3002.45,814
CS3: D9.1 U12.76 | length 322.1
  Top Layer w8: D9.1@2501,941.55 2568.55,941.55 2662,1035 2736.77,1035 2744.6,1027.17 U12.76@2744.6,990.65
CS4: D13.1 U12.75 | length 848.7
  Top Layer w10: D13.1@1877,941.55 1937.55,941.55 2053.58,1057.58 U12.75@2677.67,1057.58
D\R\D\Y\1\: D10.1 R12.2 U12.74 | length 1983.4
  Top Layer w10: v1(2618.82,1091.95) 2633.51,1077.26 U12.74@2677.67,1077.26
  Bottom Layer w15: v1(2618.82,1091.95) 2707,1003.77 ; 2707,1002 2707,465 2788,384 3703,384 3761,442 v1(3761,587.17)
D\R\D\Y\2\: D14.1 R18.2 U12.73 | length 899.8
  Top Layer w10: U12.73@2677.67,1096.95 v1@2731.82,1096.95
  Top Layer w22: v1(3176,619) v1@3176,621
  Bottom Layer w15: v1(2734.82,1096.95) 2734.82,750.18 2866,619 v1(3176,619)
  Bottom Layer w22: v1@2734,1098 2734.82,1097.18 v1(2734.82,1096.95)
D\R\D\Y\3\: D11.1 R13.2 U12.72 | length 989.4
  Top Layer w10: v1(2333,1088) 2361.63,1116.63 U12.72@2677.67,1116.63
  Bottom Layer w12: v1(2333,1088) 2333,691 2405,619 v1(2539,619)
D\R\D\Y\4\: D15.1 R19.2 U12.71 | length 1116.7
  Top Layer w8: v1@2085,1141 2087.78,1138.22 2674.78,1138.22 U12.71@2677,1136
  Bottom Layer w15: v1(2076,619) v1@2076,1141.67
  other v1: 2076,1141
FB_12V: R4.1 R5.2 U3.3
GND: C1.1 C2.1 C3.1 C4.2 C5.1 C6.2 C7.1 C8.2 C9.1 C10.1 C11.1 C12.1 C13.1 C14.1 C17.2 C18.2 C19.1 C20.1 C21.1 C22.1 C23.1 C24.1 C27.2 C28.2 C29.2 C30.2 C31.2 C32.2 C33.2 C34.1 C35.1 C36.2 C37.2 C38.2 C40.1 C41.1 C42.1 C43.2 C45.2 C46.2 C47.2 C48.2 C49.2 C50.2 C51.2 C52.2 C53.2 C54.2 C55.1 C56.2 C60.2 C61.1 C62.2 Cx1.1 Cx2.2 Cx3.1 Cx4.1 D1.1 D2.1 D3.1 D4.3 D5.3 D7.2 D16.2 D17.2 D18.2 D19.1 D20.1 D21.2 D22.2 D23.2 D24.2 D25.2 D26.2 D27.2 D28.2 D29.2 J1.5 J1.MH1 J1.MH2 J1.MH3 J1.MH4 J1.MP1 J1.MP2 J2.5 J2.MH1 J2.MH2 J2.MH3 J2.MH4 J2.MP1 J2.MP2 J3.5 J3.SH1 J3.SH2 J3.SH3 J8.2 J8.3 J9.1 J9.2 J9.3 J9.4 J9.C5 J10.2 J10.3 J12.2 J12.10 J13.6 J14.6 J14.S1 J14.S2 J14.S3 J14.S4 J14.SW-B J15.4 LED1.2 LED2.2 LED6.2 OLED7.4 OLED10.1 Q1.2 Q2.2 Q3.2 Q4.2 R2.1 R3.1 R5.1 R12.1 R13.1 R18.1 R19.1 R28.2 R30.2 R32.2 R34.2 R43.2 R50.1 R54.1 SW1.1 U1.1 U2.3 U2.6 U3.2 U4.1 U4.14 U5.1 U5.14 U6.1 U6.14 U7.1 U7.14 U8.2 U9.2 U10.7 U11.2 U11.17 U11.18 U11.29 U11.39 U11.45 U11.46 U11.54 U11.58 U11.59 U11.61 U11.62 U11.63 U11.64 U11.65 U12.11 U12.32 U12.62 U12.81 U12.99 U13.2 U13.25 U14.2 U15.2 X1.2 X1.4 | length 18601.1
  Top Layer w8: D2.1@364,2513.13 364.66,2513.13 364.72,2513.06 364.72,2512.4 381.68,2495.45 v1(381.68,2491.97) ; v1(2628,1395) 2628,1319.77 2634.29,1313.48 U12.62@2677.67,1313.48 ; U12.81@2843.03,990.65 2843,1031 v1(2864,1052) ; v1(3197,1048) 3197.36,1047.64 U12.99@3197.36,990.65 ; U13.25@3906.29,1324.42 U13.25@3935.82,1353.95 ; J14.S2@4159.82,954.81 J14.S2@4160.87,953.76
  Top Layer w10: v1@970.82,2046.95 D16.2@970.82,2009.55 D16.2@972.71,2011.44 ; C29.2@1076.82,1907.95 1107.14,1907.95 1113,1902.09 1113,1880.65 1118.86,1874.79 U8.2@1143.8,1874.79 ; C32.2@1076.82,2023.95 1079.32,2023.95 1089.32,2013.95 1089.32,2011.45 1109.53,1991.24 1143.35,1991.24 U9.2@1143.8,1990.79 ; D24.2@1209,369.09 D24.2@1209.09,369 ; v1(3081,1520) 3099.03,1538.03 U12.32@3099.03,1597.04
  Top Layer w12: D4.3@357.37,2431 D4.3@359,2429.37 ; D18.2@1282,1313 D17.2@1282,1335 v1(1282,1357) ; R50.1@1418,337 R50.1@1430,325 ; U12.32@3098.93,1596.95 U12.32@3099.03,1597.04 ; X1.2@3133.52,1736.41 3155.07,1718.79 3198.57,1687.11 X1.4@3220.13,1669.48 3216.19,1669.48 X1.4@3198.57,1651.86 ; v1@3224.82,1293.95 3224.82,1263.95 3234.34,1254.43 U12.11@3283.97,1254.43 ; v1(3855.82,1233.95) 3890.82,1233.95 3906.29,1249.42 U13.2@3906.29,1277.18 U13.25@3906.29,1324.42 ; v1(4344.63,1118.6) D5.3@4344.63,1156 4346.46,1157.83 v1(4346.46,1198.5) ; LED6.2@4581.53,1737 LED6.2@4582,1737.47
  Top Layer w16: J3.SH1@4573.67,1371.18 J3.SH1@4578.89,1376.41
  Top Layer w18: C30.2@3397.94,1601.83 3397.94,1536.06 3426.82,1507.18 U10.7@3459.57,1507.18 ; LED6.2@4581,1737.47 4581,1812
  Top Layer w20: v1(-59.18,375.95) -56.13,379 23,379 ; v1(359,2403) D4.3@359,2429.37 ; C34.1@698.82,2074.95 698.82,2126.95 707.13,2135.26 J9.C5@707.13,2185.45 ; 1019,364 1024.09,369.09 D23.2@1072,369.09 ; D24.2@1209.09,369 v1(1241,369) ; R54.1@1440,601 1443,604 R54.1@1443,606.5 Cx1.1@1443,656 U14.2@1443,709.6